# Altium PCB CH32H417QEU-R1.PcbDoc (part 3 of 6)
Units mil, origin at the board's own origin, x right, y up, seen from the top; angles counter-clockwise.
Board outline 4921.26 x 3346.46 mil, 4 copper layers (Top Layer, Layer 1, Layer 2, Bottom Layer), stack 23.756 mil thick; 271 components, 257 nets, 1065 pads, 927 vias.
Unrouted connection lines stored in the file: 149.
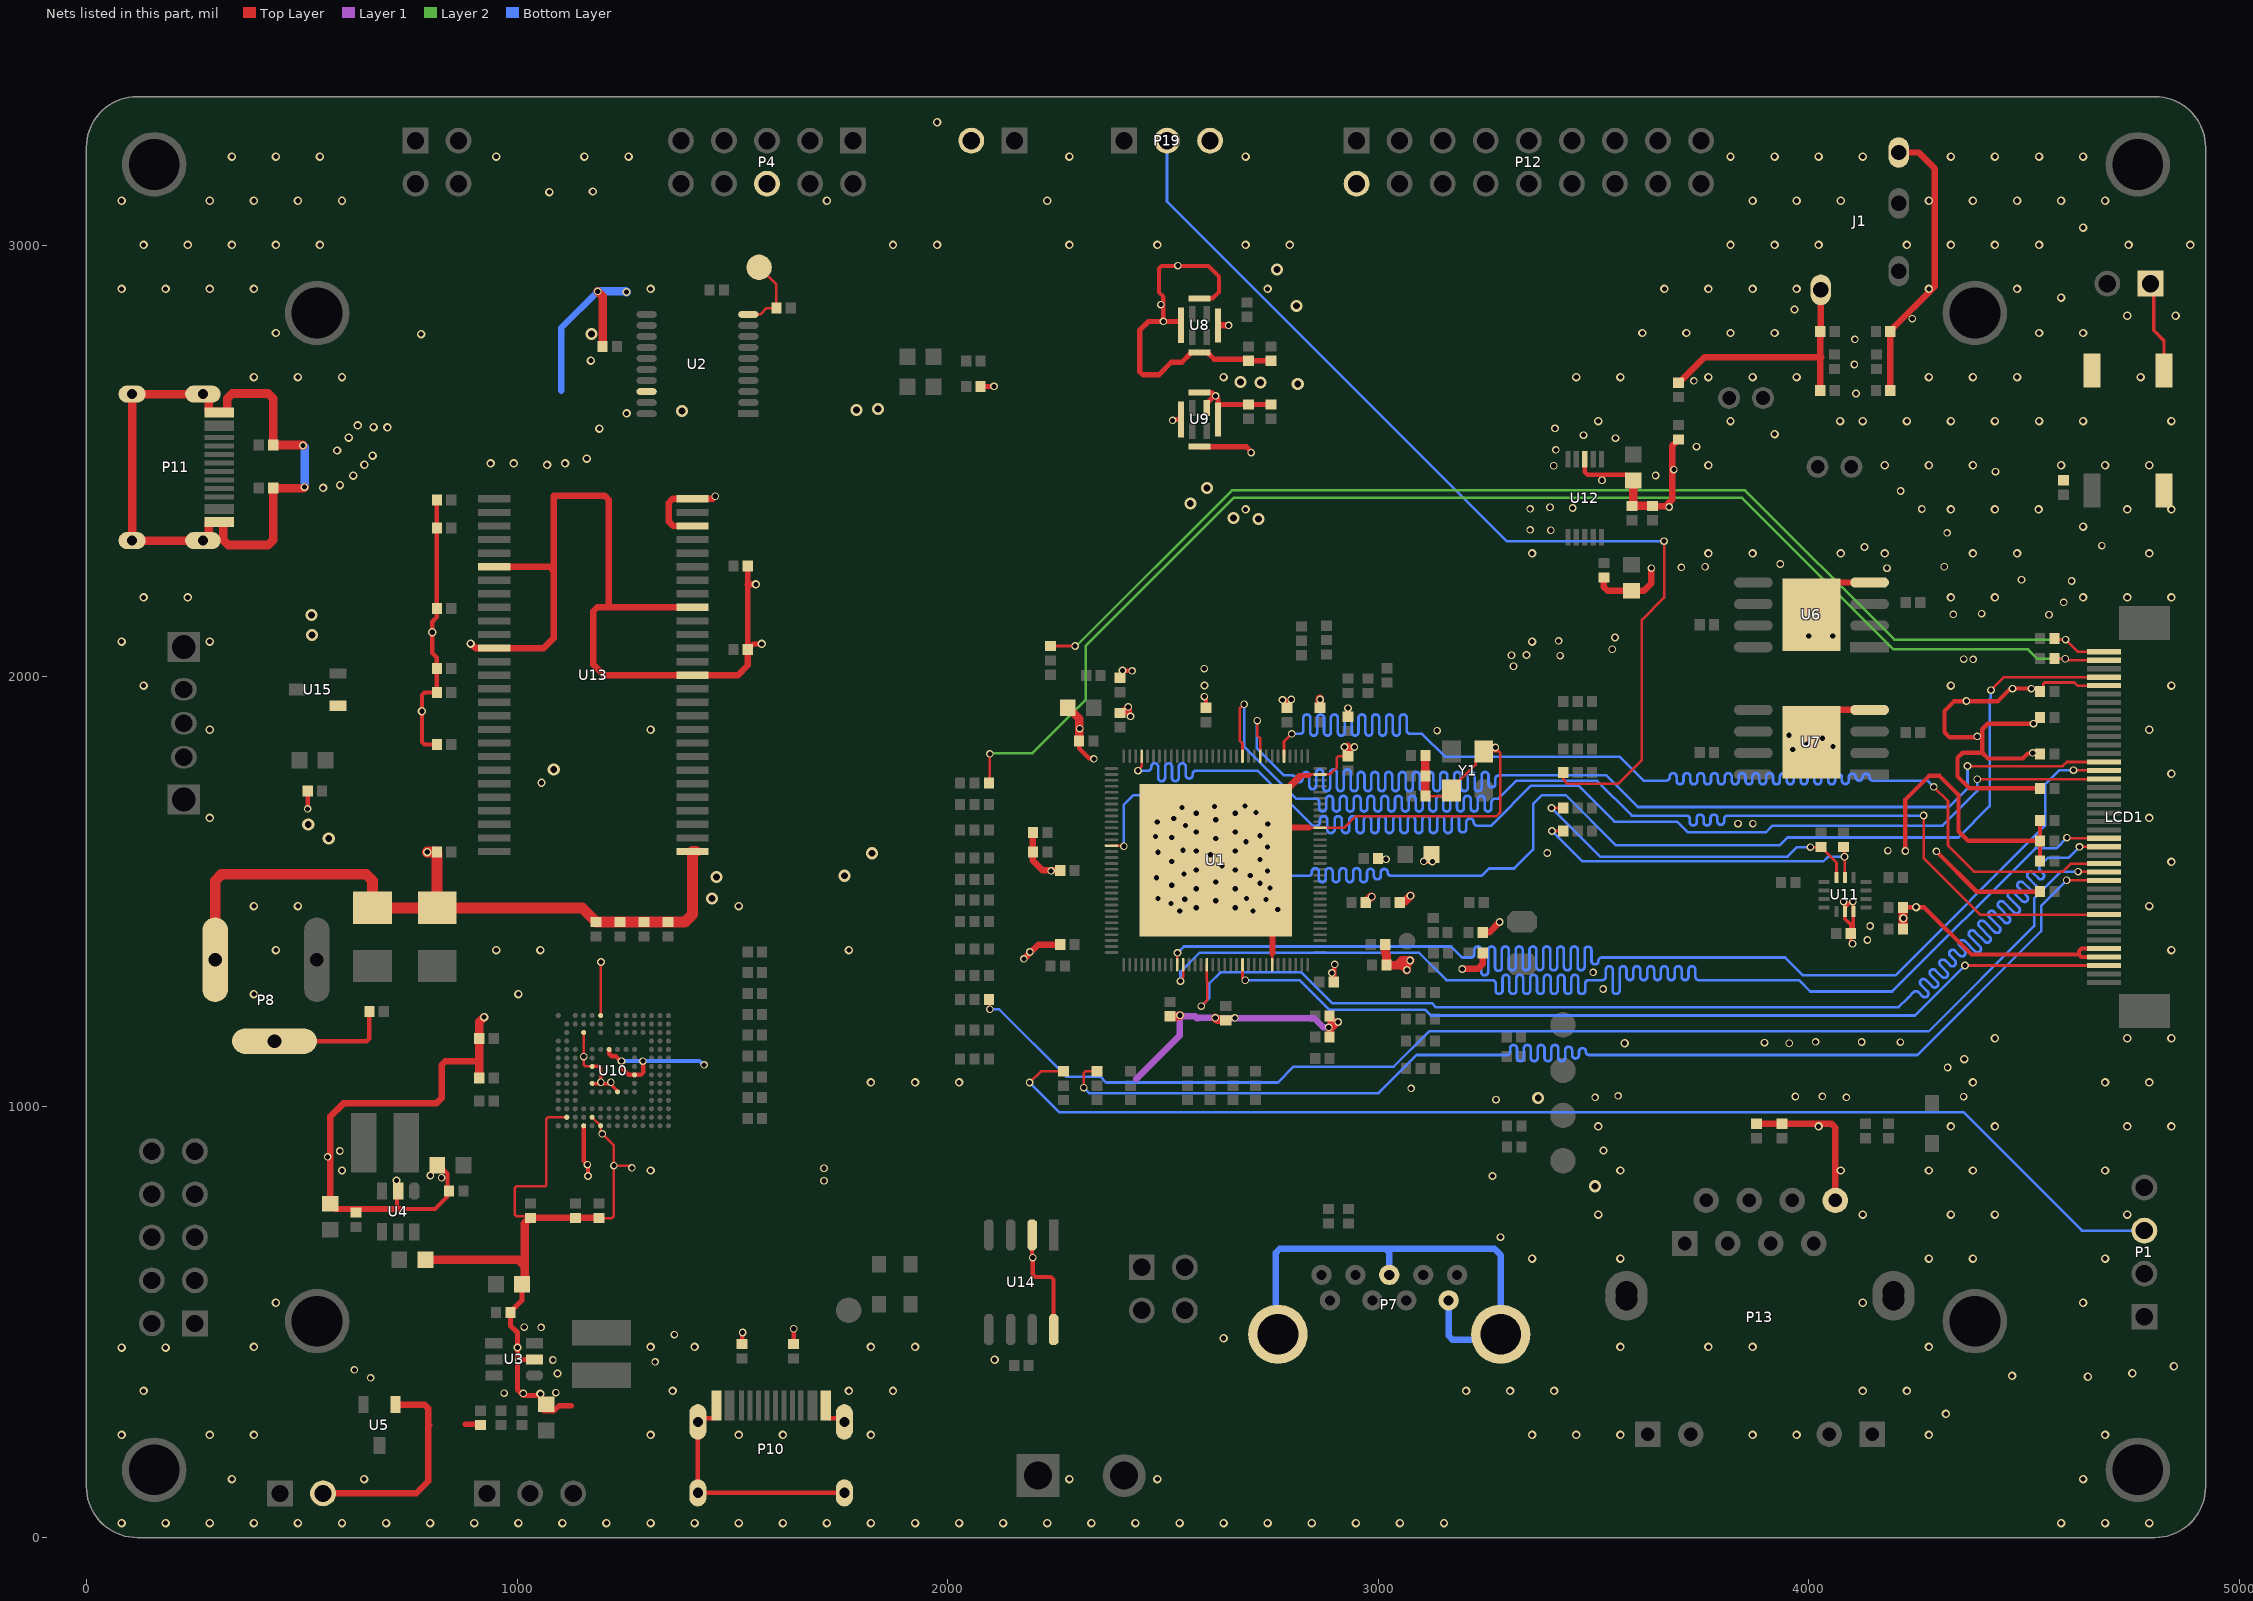
[diagram p5: the nets of this part, all layers, seen from the top]

## Via types
v1: diameter 17.72, hole 11.81, Top Layer to Bottom Layer, tented both sides, 558 vias
v2: diameter 19.68, hole 11.81, Top Layer to Bottom Layer, tented both sides, 320 vias
v3: diameter 28, hole 16, Top Layer to Bottom Layer, tented both sides, 24 vias
v4: diameter 20, hole 12, Top Layer to Bottom Layer, tented both sides, 22 vias
v5: diameter 27.56, hole 15.75, Top Layer to Bottom Layer, tented both sides, 3 vias

## Nets (pads, with @x,y where several pads share a name; then routed paths per layer and width w, separated by ;. In a path a pad name is that pad's centre, name@x,y a point inside that pad or via, vN(x,y) a via of type N, cw(c..) or ccw(c..) an arc to the next point about the centre after c; other vN are vias at no path point) (continued)
GND: C1.2 C2.2 C3.2 C4.2 C5.1 C6.2 C7.2 C8.1 C9.2 C10.2 C11.1 C12.1 C13.1 C14.1 C15.1 C16.1 C17.1 C18.2 C19.1 C20.1 C21.2 C22.1 C23.1 C24.1 C25.2 C26.1 C27.1 C28.2 C29.1 C30.2 C31.1 C32.1 C35.1 C36.1 C37.1 C38.1 C39.1 C40.1 C41.1 C42.1 C43.1 C46.1 C47.1 C48.1 C49.2 C50.2 C51.1 C52.1 C53.2 C54.2 C55.2 C56.1 C57.1 C58.1 C59.1 C60.1 C61.1 C62.1 C63.1 C64.1 C65.1 C67.1 C69.1 C70.1 C71.1 C72.1 C73.1 C74.1 C75.1 C76.1 C81.1 C82.1 J1.1 J1.4 LCD1.4 LCD1.5 LCD1.36 P3.2 P4.6 P7.0 P7.4 P7.7 P8.2 P8.3 P9.2 P10.0 P10.A1 P10.B1 P11.0 P11.A1 P11.B1 P12.2 P13.8 P19.3 R78.1 R84.1 R86.2 R87.2 R88.2 R89.2 R90.2 R91.2 R107.2 R112.2 R113.2 R114.2 R115.2 R116.2 R117.2 R118.2 R119.2 R121.2 R122.2 R124.2 R125.2 R126.1 R127.2 S1.2 S2.2 U1.0 U1.22 U1.31 U1.122 U2.18 U3.2 U4.2 U5.1 U6.0 U6.4 U7.0 U7.4 U8.5 U9.2 U9.5 U10.A6 U10.C4 U10.E7 U10.G5 U10.H10 U10.J5 U10.K8 U10.N2 U10.N5 U10.P4 U10.P6 U11.6 U11.7 U12.8 U13.6 U13.12 U13.28 U13.41 U13.46 U13.52 U13.54 U14.2 U14.8 U15.1 Y1.2 Y1.4 | length 23966.8
  Top Layer w6: C52.1@1025.48,737.09 1025.48,738.07 1025.48,742.19 1020.98,746.69 998.36,746.69 994.84,750.21 994.84,812.12 998.36,815.64 1064.42,815.64 1067.94,819.15 1067.94,972.65 1071.45,976.16 U10.N2@1115.46,976.16 ; v1@1154.83,1118.61 1154.9,1118.67 1154.9,1172.94 U10.C4@1154.83,1173.01 ; v1(1154.97,1116.85) 1154.83,1116.72 1154.83,1098.68 1159.24,1094.27 U10.G5@1174.52,1094.27 ; U10.N5@1174.52,976.16 U10.P6@1194.2,956.48 1194.2,944.49 1197.85,940.84 v1(1197.85,937.67) ; C54.2@1190.78,742.38 1191.19,741.97 1220.35,741.97 1225.05,746.67 v1(1225.05,863.72) ; U10.A6@1194.2,1212.38 1194.62,1212.8 1194.62,1336.42 v1(1195.04,1336.84) ; v1@1199.68,935.84 1225.05,910.47 v1(1225.05,863.72) ; v1(1266.56,858.69) 1263.39,858.69 1258.35,863.72 v1(1225.05,863.72) ; U1.0@2622.69,1572.51 2753.59,1441.6 2753.59,1351.45 ; U1.0@2746.59,1646.34 2748.55,1648.3 2843.61,1648.3 ; U1.0@2748.75,1399.77 2748.98,1399.77 2750.4,1398.35 2750.4,1354.64 2753.59,1351.45 ; U1.122@2753.59,1330.38 2753.59,1351.45 ; U1.0@2758.23,1396.7 2758.23,1356.09 2753.59,1351.45 ; U1.0@2776.86,1726.69 U1.0@2795.97,1745.79 ; U1.0@2785.65,1742.83 2815.13,1772.31 2822.49,1772.31 ; U1.0@2795.33,1643.33 2795.33,1644.1 2796.85,1645.62 2841.34,1645.62 2844.02,1648.3 ; U1.0@2795.97,1738.28 U1.0@2795.97,1745.79 ; U1.0@2797.07,1739.25 2797.48,1739.25 2825.42,1767.19 ; U1.0@2798.86,1652.86 2839.05,1652.86 2843.61,1648.3 ; C28.2@2929.59,1814.56 2907.4,1814.56 2903.88,1811.05 2903.88,1788.83 2890.15,1775.09 2889.65,1775.09 2886.87,1772.31 U1.31@2864.81,1772.31 2844.45,1772.31 ; C17.1@3109.34,1721.83 3156.55,1721.83 Y1.4@3170.02,1735.3 3170.02,1739.24 3226.17,1795.39 3226.17,1807.2 Y1.2@3242.85,1823.88 ; Y1.2@3244.82,1825.85 3279.93,1825.85 3283.45,1822.34 3283.45,1684.57 3274.05,1675.17 2947.35,1675.17 2920.48,1648.3 U1.22@2864.81,1648.3 2844.02,1648.3 ; Y1.2@3245.06,1826.09 Y1.2@3253.83,1834.87 ; v1@3269.71,1836.74 3270.75,1833.87 v1(3271.94,1834.87) ; R114.2@4536.54,1965 4544.47,1972.94 4544.47,1982.64 4547.63,1985.8 4616.48,1985.8 4620.68,1981.6 4623.91,1978.36 LCD1.36@4685,1978.36 ; U1.0@2795.97,1745.79 2817.37,1767.19 ; 2817.37,1767.19 2825.42,1767.19 ; 2817.37,1767.19 2822.49,1772.31 ; 2822.49,1772.31 2844.45,1772.31 ; 2825.42,1767.19 2839.33,1767.19 2844.45,1772.31 ; 2843.61,1648.3 2844.02,1648.3
  Top Layer w8: U10.J5@1174.52,1054.9 1175.08,1054.33 1201.24,1054.33 1201.81,1053.76 1216.42,1053.76 1228.79,1041.39 1228.79,1041.03 1233.57,1036.25 U10.K8@1233.57,1035.22 ; U10.G5@1176.57,1094.29 1190.12,1094.29 1194.81,1089.61 v1(1194.81,1057.38) ; v1(4080.76,1477.34) 4080.76,1474.71 4082.84,1472.63 4082.84,1454.61 U11.6@4083.76,1453.69 ; v1(4101.14,1379.04) 4101.14,1381.67 4097.11,1385.69 C58.1@4097.11,1403.22 ; U11.6@4083.76,1453.69 4083.76,1461.56 4087.93,1465.73 4087.93,1467.11 4098.16,1477.34 4098.16,1474.71 4103.45,1469.41 U11.7@4103.45,1453.69 4102.53,1452.77 4102.53,1408.64 C58.1@4097.11,1403.22 ; U11.6@4083.76,1453.69 4083.76,1437.2 4097.11,1423.85 C58.1@4097.11,1403.22
  Top Layer w10: P8.3@436.82,1152.91 650.82,1152.91 656.68,1158.77 C41.1@656.68,1221.42 ; v1(513.87,1692.22) R87.2@513.87,1734.09 ; U4.2@717.2,804.46 721.3,808.56 U4.2@721.3,816.81 ; v1(719.98,829.29) 721.46,827.81 721.46,807 U4.2@724.01,804.46 ; U4.2@721.3,804.46 721.3,768.95 727.15,763.09 809.42,763.09 838.56,792.23 838.56,845.09 C37.1@819.59,864.05 ; R127.2@813.93,1841.77 785.07,1841.77 779.22,1847.62 779.22,1956.91 785.07,1962.77 R126.1@813.93,1962.77 C75.1@813.93,2017.77 813.93,2043.42 803.18,2054.17 803.18,2127.02 813.93,2137.78 C73.1@813.93,2344.77 C70.1@813.93,2409.77 ; U10.P4@1154.83,956.48 1154.83,874.41 1164.95,864.3 v1(1164.95,839.61) ; U10.E7@1213.89,1133.64 1214.23,1133.29 1214.23,1123.44 1220.09,1117.58 1229.78,1117.58 1240.78,1106.59 v1(1242.61,1106.59) 1242.61,1091.3 1259.32,1074.59 U10.H10@1272.94,1074.59 1287.56,1074.59 1293.42,1080.44 v1@1293.42,1107.01 ; P10.A1@1463.11,306.76 1463.11,284.12 1456.3,277.31 1428.74,277.31 P10.0@1420,268.57 P10.0@1420,104 P10.0@1760.16,104 ; R90.2@1522,449.46 1522.91,450.38 1522.91,475.46 v1(1523.82,476.37) ; R91.2@1642,449.46 1642.36,449.82 1642.36,484.76 v1(1642.72,485.12) ; P10.B1@1717.05,306.76 1717.05,284.12 1723.86,277.31 1751.42,277.31 P10.0@1760.16,268.57 ; v1@2196,650.24 U14.2@2196,703 ; v1(2197.62,650.24) 2197.62,611.28 2203.48,605.43 2240.14,605.43 2246,599.57 U14.8@2246,483 ; C6.2@2305.29,1849.89 2305.29,1832.95 2328.28,1809.97 2337.99,1809.97 v1(2339.47,1808.49) ; C7.2@2400.44,1915.24 C7.2@2401.43,1915.24 ; C8.1@2400.44,1996.65 2404.53,2000.74 2404.53,2012.12 v1(2406.01,2013.59) 2406.37,2013.23 2427.95,2013.23 v1(2428.31,2012.87) ; v1(2501.02,2824.34) 2501.02,2881.8 2491.02,2891.8 2491.02,2947.16 2496.88,2953.02 2605.67,2953.02 2630.04,2928.65 2630.04,2892.7 2615.33,2877.99 U8.5@2585,2877.99 ; v1(2596.18,1952.91) 2599.81,1949.28 C10.2@2599.81,1927.01 ; v1@2784.48,1945.57 2785.95,1944.09 2785.95,1928.98 C12.1@2787.93,1927.01 ; v1@2862.42,1944.06 2863.28,1944.06 2864.18,1943.16 v1@2864.52,1942.82 ; C15.1@2864.18,1927.01 2864.52,1927.35 v1@2864.52,1942.82 ; v1(2864.85,1946.39) 2864.52,1946.05 v1@2864.52,1942.82 ; C13.1@2885.05,1162.87 2886.96,1164.78 2886.96,1177.49 2886.96,1209.78 C14.1@2886.96,1210.76 ; C16.1@2896.43,1289.84 2897.66,1291.07 2897.66,1329.83 v1(2898.88,1331.06) ; C29.1@2929.62,1906.29 C29.1@2929.72,1906.4 ; v1@2929.72,1926.26 v1(2929.82,1926.36) ; U12.8@3479.5,2504.22 3479.5,2474.64 3486.07,2468.06 3578.9,2468.06 C65.1@3592.2,2454.76 ; C59.1@4218.65,1463.58 4267.81,1463.58 4377.41,1353.98 4627.2,1353.98 ; v1(4224.08,1594.56) 4224.08,1714.22 4278.85,1768.99 4303.31,1768.99 4347.45,1724.85 4347.45,1640.51 4369.96,1618 R119.2@4536.54,1618 ; v1(4296.03,1593.64) 4389.67,1500 R117.2@4536.54,1500 ; v1(4516.65,1971.64) 4467.99,1971.64 4438.29,1941.94 4337.18,1941.94 4315.02,1919.79 4315.02,1870.17 4326.88,1858.31 4402.54,1858.31 ; v1(4519.84,1822.37) 4518.36,1820.9 4508.06,1820.9 4496.34,1809.17 4416.09,1809.17 4402.54,1822.72 ; v1(4521.5,1890.09) 4415.43,1890.09 4402.54,1877.2 4402.54,1858.31 ; R116.2@4533.71,1670.28 4536.54,1667.45 R116.2@4536.54,1665 R119.2@4536.54,1618 ; R118.2@4536.54,1571 R119.2@4536.54,1618 ; R115.2@4536.54,1740 4372.63,1740 4345.24,1767.4 4345.24,1810.87 4357.09,1822.72 4402.54,1822.72 ; LCD1.4@4685,1348.44 4632.74,1348.44 4627.2,1353.98 ; LCD1.5@4685,1368.13 4633.06,1368.13 4627.2,1362.27 4627.2,1353.98 ; C7.2@2401.43,1915.24 2417.54,1915.24 2422.66,1910.12 v1@2424.74,1910.12 ; C7.2@2401.43,1915.24 2413.81,1927.62 v1@2417.85,1927.62 ; v1@2417.85,1927.62 2417.85,1919.34 2416.69,1918.18 v1@2423.27,1911.6 ; v1@2417.85,1927.62 v1@2418.59,1928.36 ; v1@2418.59,1928.36 v1@2419.32,1927.62 ; v1@2418.59,1928.36 v1(2419.32,1929.1) v1@2419.32,1927.62 ; v1@2419.32,1927.62 2419.32,1927.01 v1@2420.8,1925.53 ; v1@2419.32,1927.62 2420.8,1926.14 v1@2420.8,1925.53 ; v1@2420.8,1925.53 2420.8,1916.16 v1@2423.27,1913.69 ; v1@2420.8,1925.53 2423.27,1923.06 v1@2423.27,1913.69 ; v1@2423.27,1911.6 v1@2424.74,1910.12 ; v1@2423.27,1911.6 v1@2423.27,1913.69 ; v1@2423.27,1913.69 2424.74,1912.21 v1@2424.74,1910.12 ; 4402.54,1822.72 4402.54,1858.31
  Top Layer w11.81: C32.1@1011.68,588.05 1011.68,551.2 984.52,524.03 C31.1@984.52,523.05 984.52,492.84 1001.13,476.23 v1@1001.13,406.84 ; U3.2@1040.61,413.76 1008.05,413.76 v1@1001.13,406.84 ; 1126.12,306.16 1097.26,306.16 1085.73,294.63 1061.12,294.63 1061.12,323.17 1054.2,330.08 1014.57,330.08 1001.13,343.52 v1@1001.13,406.84
  Top Layer w12: 879,263.11 912.96,263.11 R86.2@914.9,261.16 ; C71.1@1535.86,2062.77 C71.1@1535.86,2063.75 ; C72.1@1535.86,2255.77 1535.86,2213.1 C71.1@1535.86,2063.75 ; v2(1568.24,2075.47) 1548.57,2075.47 1542.66,2069.56 1541.67,2069.56 C71.1@1535.86,2063.75 ; R84.1@2076.52,2673.36 v1(2107.72,2673.36) ; v1(2522.49,2594.49) 2524.04,2594.49 2526.12,2596.57 U9.5@2541.69,2596.57 ; U8.5@2541.69,2815 2541.69,2823.45 2540.8,2824.34 v1(2501.02,2824.34) 2466.6,2824.34 2446.28,2804.02 2446.28,2707.58 2453.31,2700.56 2490.62,2700.56 2519.38,2729.32 2543.61,2729.32 2566.3,2752.01 U8.5@2585,2752.01 2603.7,2752.01 2619.31,2736.4 C82.1@2696.2,2736.4 ; U9.5@2585,2533.58 2585.38,2533.2 2693.64,2533.2 2704.8,2522.05 v1(2704.8,2519.56) ; U9.5@2585,2659.57 2612.77,2659.57 2620.78,2651.56 v1(2622.33,2651.56) ; U9.2@2601.73,2623.15 2601.73,2633.98 2618.22,2650.47 2621.23,2650.47 v1(2622.33,2651.56) ; U9.5@2627.99,2631.73 2627.99,2644.34 2622.33,2650.01 v1(2622.33,2651.56) ; U9.5@2628.31,2596.57 2628.31,2631.73 C46.1@2752.55,2631.73 ; C82.1@2696.2,2732.86 C81.1@2750.74,2732.86 ; C26.1@3123.49,1586.38 3123.49,1585.39 3109.65,1571.56 3106.75,1571.56 v1(3105.66,1570.46) 3105.82,1570.31 3125.34,1570.31 v1(3125.5,1570.15)
  Top Layer w15: P9.2@554.9,105.78 557.97,102.71 765.83,102.71 794.07,130.96 794.07,299.92 785.29,308.71 U5.1@717.94,308.71 ; C38.1@566.61,775.46 566.61,978.04 596.82,1008.25 812.59,1008.25 824.81,1020.47 824.81,1097.26 833.6,1106.05 912.31,1106.05 ; C38.1@578.97,763.09 727.15,763.09 ; 794.7,259.98 795.88,261.16 ; v2(892.27,2075.95) 893.54,2075.95 903.73,2065.76 U13.12@947.4,2065.76 1062.04,2065.76 1084.86,2088.58 1084.86,2245.95 ; U13.6@947.4,2254.73 1076.07,2254.73 1084.86,2245.95 ; C52.1@1020.4,732.01 C52.1@1025.48,737.09 ; C52.1@1025.48,738.07 1029.79,742.38 C52.1@1030.78,742.38 C53.2@1135.78,742.38 C54.2@1190.78,742.38 ; U13.46@1407.4,2160.25 1213.01,2160.25 ; U13.52@1407.4,2349.22 1362.77,2349.22 1352.44,2359.56 1352.44,2403.43 1361.22,2412.21 U13.54@1407.4,2412.21 1454.39,2412.21 v1(1460.37,2418.19) ; C71.1@1535.86,2062.77 1535.86,2025.7 1512.93,2002.77 U13.41@1407.4,2002.77 1201.75,2002.77 1177.07,2027.45 1177.07,2151.12 1186.19,2160.25 1213.01,2160.25 ; 1535.86,2213.1 1536.34,2213.58 v2(1554.69,2213.58) ; v1(2177.02,1343.89) 2210.18,1377.05 C1.2@2261.35,1377.05 ; C4.2@2198.11,1637.93 C3.2@2198.11,1591.87 2198.11,1571.97 2220.79,1549.28 C2.2@2261.35,1549.28 ; U8.5@2628.31,2815 v1(2652.62,2815) ; v1@2886.96,1177.49 v1(2906.76,1197.28) 2906.24,1197.8 2898.94,1197.8 C14.1@2886.96,1209.78 ; C29.1@2929.72,1906.4 v1@2929.72,1926.26 ; v1(3195.02,1320.51) 3231.12,1320.51 3242.84,1332.23 C18.2@3242.84,1358.03 ; C21.2@3242.84,1405.33 3257.44,1405.33 v1(3281.72,1429.6) ; C63.1@3523.86,2229.58 3523.86,2207.55 3532.65,2198.76 C64.1@3588.09,2198.76 3616.92,2198.76 3634.31,2216.15 v1(3634.31,2251.2) ; C62.1@3631.3,2395.11 3666.65,2395.11 3682.19,2410.64 3682.19,2534.78 3692.09,2544.68 3692.09,2545.67 3696.4,2549.98 R121.2@3697.38,2549.98 ; R124.2@3697.38,2681.95 3698.37,2681.95 3757.56,2741.14 4026.46,2741.14 ; C57.1@3878.09,960.99 C56.1@3937.09,960.99 4052.55,960.99 4061.34,952.21 P13.8@4061.34,782.99 ; U6.0@4025.68,2220.25 4027.93,2218 U6.4@4141,2218 ; R125.2@4026.46,2663.42 4026.46,2741.14 ; U7.0@4027.3,1921.71 4027.59,1922 U7.4@4141,1922 ; 4027.52,2787.13 4027.56,2787.17 C69.1@4027.56,2796.96 ; J1.1@4027.56,2897.64 C69.1@4027.56,2796.96 ; 4029.29,2741.14 4026.46,2741.14 ; C69.1@4029.57,2796.96 C69.1@4027.56,2796.96 ; R122.2@4188.95,2663.42 4188.95,2793.19 C67.1@4190.92,2795.16 ; C67.1@4188.95,2801.3 4188.95,2802.28 4292.21,2905.54 4292.21,3179.34 4255.02,3216.54 4209.46,3216.54 J1.4@4204.94,3221.05 ; 1084.86,2245.95 1084.86,2419.07 1204.22,2419.07 1213.01,2410.28 1213.01,2160.25 ; 4026.46,2741.14 4026.46,2796 4027.41,2796.96 C69.1@4027.56,2796.96
  Top Layer w20: P11.0@106.13,2306.09 P11.0@106.13,2655.5 P11.0@270.69,2655.5 275.49,2655.5 284.44,2646.56 284.44,2614.21 327.22,2614.21 327.22,2645.28 338.94,2656.99 422.08,2656.99 433.8,2645.28 R88.2@433.8,2537.19 502.06,2537.19 v1(503.03,2536.22) ; P11.0@106.13,2315.35 P11.0@270.69,2315.35 275.49,2315.35 284.44,2324.29 284.44,2356.65 317.61,2356.65 317.61,2316.77 329.32,2305.06 422.08,2305.06 433.8,2316.77 R89.2@433.8,2437.19 504.2,2437.19 v1(506.61,2439.6) ; C40.1@787.27,645.25 1003.61,645.25 1017.66,631.2 ; R107.2@912.31,1067.38 912.31,1106.05 C51.1@912.31,1159.44 912.31,1197.35 v2(923.61,1208.66) ; C32.1@1017.66,588.05 1017.66,631.2 ; C52.1@1020.4,732.01 1017.66,729.26 1017.66,631.2 ; v1(1187.48,2893.98) 1198.77,2882.69 C30.2@1198.77,2766.1 ; C5.1@2278.83,1928.43 2305.29,1901.98 C6.2@2305.29,1849.89 ; C9.2@2515.86,1210.56 2537.12,1210.56 v1(2539.6,1213.03) ; v1(2621.44,1206.86) 2625.67,1202.63 2644,1202.63 C11.1@2645.81,1200.82 ; C15.1@2864.18,1927.01 2864.18,1943.16 2864.18,1947.79 v1@2864.44,1948.05 ; v1@2929.5,1836.06 2929.5,1814.66 C28.2@2929.59,1814.56 ; C25.2@2971.04,1475.16 2971.04,1476.14 2983.1,1488.2 v1(2984.9,1488.2) ; C23.1@3016.07,1376.84 3016.07,1356.64 3019.07,1353.64 C22.1@3019.07,1329.25 3043.6,1329.25 ; C24.1@3049.76,1475.16 3049.76,1476.14 3051.57,1477.95 3062.11,1477.95 v1(3074.75,1490.59) ; C17.1@3109.34,1721.83 C20.1@3109.34,1768.63 R78.1@3109.34,1816.07 ; C65.1@3592.2,2454.76 3592.2,2398.96 C61.1@3589.22,2395.98 C62.1@3636.76,2395.98 ; C60.1@4218.65,1413.58 4218.65,1437.59 v2(4219.29,1438.23) 4218.65,1438.87 C59.1@4218.65,1463.58 ; 3043.6,1329.25 3055.24,1329.25 v1(3066.48,1318.02) 3066.48,1332.63 v1(3074.14,1340.29) 3054.64,1340.29 3043.6,1329.25
  Top Layer w25: P8.2@299.02,1341.89 299.02,1525.59 313.67,1540.24 649.91,1540.24 664.56,1525.59 C43.1@664.56,1462.4 C42.1@814.56,1462.4 ; v2(791.43,1591.93) 791.52,1591.85 813.85,1591.85 C74.1@813.93,1591.77 813.93,1463.03 C42.1@814.56,1462.4 ; U13.28@1415.59,1593.32 U13.28@1407.4,1593.32 1407.4,1447.23 1389.91,1429.75 C48.1@1350.89,1429.75 C49.2@1295.22,1429.75 C50.2@1239.55,1429.75 C55.2@1183.89,1429.75 1151.23,1462.4 C42.1@814.56,1462.4
  Layer 1 w15: 2437.62,1064.68 2539.35,1166.41 2539.35,1212.79 v1(2539.6,1213.03) ; v1@2539.6,1210.56 2574.69,1210.56 2578.99,1206.25 2582.58,1206.25 2583.19,1206.86 v1(2621.44,1206.86) ; v1@2621.21,1206.25 2851.42,1206.25 2872.21,1185.47 2884.32,1185.47 v1@2884.84,1184.95 ; v1(2885.07,1184.95) 2885.6,1184.95 2899.02,1198.36 v1@2906,1198.36
  Bottom Layer w10: v1(1242.61,1106.59) v1(1292.2,1106.59) 1423.51,1106.59 1433.05,1097.05 v1@1435.06,1097.05
  Bottom Layer w15: 1103.03,2662.97 1102.78,2663.22 1102.78,2809.28 v1(1187.48,2893.98) ; P7.0@2742.08,500 2762.43,520.35 2762.43,661.81 2771.22,670.6 3016.84,670.6 ; P7.0@2759.06,458.36 P7.0@2766.97,466.26 ; P7.7@3025.63,604.06 3025.63,661.81 3016.84,670.6 ; P7.4@3163.42,545 3163.42,468.52 3172.21,459.73 P7.0@3259.7,459.73 ; P7.0@3302.62,476.68 3284.29,495.01 3284.29,656.08 3269.77,670.6 3016.84,670.6
  Bottom Layer w20: v1(503.03,2536.22) 506.61,2532.64 v1(506.61,2439.6) ; v1(1187.48,2893.98) 1252.87,2893.98 v1(1254.26,2892.59)
  other v1: 970.21,335.37 1014.45,335.08 1090.37,336.51 660.2,371.08 1094.1,381.17 622.41,389.5 1320.81,408.03 1004.59,410.3 1083.28,412.61 1001.13,441.53 1365.4,471.46 1055.97,488.35 1016.86,488.66 3284,697.9 1712.8,828.76 824.95,835.61 3265.3,839.83 798.73,841.05 1712.8,857.85 1163.25,865.99 560.16,884.11 588.63,897.67 3523.07,898.84 3273.28,1017.11 3503.56,1022.35 4087.19,1022.25 3968.69,1024.33 4359.29,1023.94 4031.27,1024.79 3556.95,1025.95 3076.27,1043.1 1217.85,1057.38 4322.28,1091.81 1434.38,1097.81 3954.4,1148.04 3896.98,1149.54 4015.71,1151.25 4122.64,1151.02 4212.41,1150.6 2666.87,1206.86 3522.05,1273.91 2892.4,1311.61 3499.13,1312.79 2191.03,1359.82 4135.9,1387.89 4142.21,1420.25 2539,1454.76 2709.45,1455.23 2766.6,1458.42 2519.16,1472.23 4102.16,1477.34 2550.65,1482.45 2739.2,1482.15 2488.94,1484.04 2693.79,1483.87 2749.02,1508.17 2485.27,1532.29 2702.63,1537.24 2548.53,1540.77 2240.35,1548.25 2742.54,1548.38 2636.74,1560.06 3017.87,1575.24 2610.68,1585.74 3392.36,1589.84 2488.09,1591.67 4183.49,1595.27 2546.41,1596.26 2742.54,1603.67 2692.73,1616.05 2483.15,1627.72 2552.03,1654.02 2743.35,1656.93 3835.28,1657.9 3870.02,1657.9 2486.68,1661.64 2525.08,1669.77 2715.72,1684.17 2544.54,1695.45 2619.81,1698.04 2690.71,1698.82 3962.45,1830.22 2921.5,1836.06 2944.46,1836.06 4055.68,1836.8 3995.88,1843.32 4031.37,1856.39 4390.95,1860.82 3954.16,1863.37 3136.84,1873.93 2306.7,1878.78 2424.74,1907.12 4365.72,1942.69 2777.48,1945.57 2797.94,1946.27 4472.93,1971.49 2596.52,1978.95 2595.88,2017.97 3313.95,2023.49 4359.64,2040.06 4381.51,2039.65 3422.22,2048.12 3309.3,2049.05 3344.15,2049.51 3543.44,2063.08 3418.93,2082.5 3549.77,2090.18 3999.76,2094.21 4055.49,2093.72 4557.57,2143.02 4335.23,2143.89 4401.07,2145.69 4591.81,2171.93 4610.08,2221.4 4493.83,2224.42 4181.52,2251.25 3703.83,2253.11 3759.02,2254.62 4314.36,2254.64 3933.56,2260.99 4129.23,2300.41 4680.28,2303.57 4320.9,2333.16 3400.76,2339.27 3352.82,2340.25 3352.74,2389.12 4262.48,2388.75 3451.5,2390.89 3398.92,2392.67 3675.34,2393.19 4212.91,2430.49 3519.56,2455.5 3643.97,2466.57 4433.35,2475.49 3686.42,2480.11 3407.61,2489.02 3412.57,2525.91 3738.9,2533.58 3550.89,2553.21 3476.61,2560.06 3410.44,2575.92 4109.56,2657.01 3732.77,2686.11 4105.49,2724.25 4106.85,2782.47 4239.98,2830.76 3966.5,2851.96 2495.01,2863.14 2534.56,2953.82
  other v2: 81.77,33.62 184.13,33.62 286.5,33.62 388.86,33.62 491.22,33.62 593.58,33.62 695.94,33.62 798.31,33.62 900.67,33.62 1003.03,33.62 1105.39,33.62 1207.76,33.62 1310.12,33.62 1412.48,33.62 1514.84,33.62 1617.2,33.62 1719.57,33.62 1821.93,33.62 1924.29,33.62 2026.65,33.62 2129.02,33.62 2231.38,33.62 2333.74,33.62 2436.1,33.62 2538.46,33.62 2640.83,33.62 2743.19,33.62 2845.55,33.62 2947.91,33.62 3050.27,33.62 3152.64,33.62 4585.71,33.62 4688.07,33.62 4790.43,33.62 337.68,135.98 644.76,135.98 2282.56,135.98 2487.28,135.98 4636.89,135.98 81.77,238.35 286.5,238.35 388.86,238.35 1310.12,238.35 1514.84,238.35 1617.2,238.35 1821.93,238.35 3357.36,238.35 3459.72,238.35 3562.09,238.35 3869.17,238.35 3971.53,238.35 4278.62,238.35 4688.07,238.35 4317.97,287.28 1054.21,333.71 132.95,340.71 1361.3,340.71 1770.75,340.71 1873.11,340.71 3203.82,340.71 3306.18,340.71 3408.54,340.71 4125.08,340.71 4227.44,340.71 4647.84,373.56 4471.84,375.37 4751.31,381.62 4847.51,397.98 2109.02,413.07 81.77,441.07 184.13,441.07 388.86,443.07 1310.12,443.07 1412.48,443.07 1821.93,443.07 1924.29,443.07 3562.09,443.07 3766.81,443.07 3869.17,443.07 4278.62,443.07 2640.83,463.07 440.04,545.43 4125.08,545.43 4636.89,545.43 3357.36,647.79 3562.09,647.79 4278.62,647.79 4380.98,647.79 4688.07,647.79 3510.9,750.16 4125.08,750.16 4329.8,750.16 4432.16,750.16 4739.25,750.16 593.58,852.52 1310.12,852.52 3562.09,852.52 4073.9,852.52 4278.62,852.52 4380.98,852.52 4688.07,852.52 3510.9,954.88 4022.72,954.88 4329.8,954.88 4432.16,954.88 4739.25,954.88 4841.61,954.88 1821.93,1057.24 1924.29,1057.24 2026.65,1057.24 4380.98,1057.24 4688.07,1057.24 4790.43,1057.24 4360.73,1111.06 3572.21,1148 4432.16,1159.61 4739.25,1159.61 4841.61,1159.61 388.86,1261.97 1003.03,1261.97 440.04,1364.33 951.85,1364.33 1054.21,1364.33 1770.75,1364.33 4841.61,1364.33 4248.83,1464.34 388.86,1466.69 491.22,1466.69 1514.84,1466.69 4790.43,1466.69 4841.61,1569.05 286.5,1671.42 4790.43,1671.42 1056.86,1752.94 4841.61,1773.78 286.5,1876.14 1310.12,1876.14 4790.43,1876.14 779.22,1919.04 132.95,1978.5 4329.8,1978.5 4841.61,1978.5 81.77,2080.87 286.5,2080.87 3357.36,2080.87 803.18,2102.38 132.95,2183.23 235.31,2183.23 4329.8,2183.23 4432.16,2183.23 4636.89,2183.23 4739.25,2183.23 4841.61,2183.23 3357.36,2285.59 3766.81,2285.59 3869.17,2285.59 4073.9,2285.59 4176.26,2285.59 4380.98,2285.59 4483.35,2285.59 4790.43,2285.59 4636.89,2347.95 2692.01,2387.95 4329.8,2387.95 4432.16,2387.95 4533.43,2387.95 4739.25,2387.95 4841.61,2387.95 549.85,2437.74 588.9,2444.34 619.78,2466.21 3766.81,2490.31 4176.26,2490.31 4278.62,2490.31 4380.98,2490.31 4585.71,2490.31 4688.07,2490.31 4790.43,2490.31 645.5,2491.47 1070.08,2491.1 938.83,2494.81 992.32,2494.81 1111.63,2494.81 1161.83,2505.51 664.84,2512.44 582.13,2524.53 609.22,2554.38 3920.35,2562.68 1191.39,2575.59 698.78,2578.22 667.12,2578.69 630.05,2582.8 3510.9,2592.68 3817.99,2592.68 4072.72,2592.68 4125.08,2592.68 4227.44,2592.68 4329.8,2592.68 4432.16,2592.68 4534.53,2592.68 4636.89,2592.68 4841.61,2592.68 1254.7,2610.51 388.86,2695.04 491.22,2695.04 593.58,2695.04 2640.83,2695.04 3459.72,2695.04 3562.09,2695.04 3766.81,2695.04 3869.17,2695.04 3971.53,2695.04 4278.62,2695.04 4380.98,2695.04 4483.35,2695.04 4770.43,2695.04 1171.67,2733.13 777.16,2794.8 440.04,2797.4 3613.27,2797.4 3715.63,2797.4 3817.99,2797.4 3920.35,2797.4 4534.53,2797.4 4636.89,2797.4 4739.25,2837.4 4851.61,2837.4 4585.71,2879.76 81.77,2899.76 184.13,2899.76 286.5,2899.76 388.86,2899.76 1310.12,2899.76 2743.19,2899.76 3664.45,2899.76 3766.81,2899.76 3869.17,2899.76 3971.53,2899.76 4278.62,2899.76 4483.35,2899.76 132.95,3002.13 235.31,3002.13 337.68,3002.13 440.04,3002.13 542.4,3002.13 1873.11,3002.13 1975.47,3002.13 2282.56,3002.13 2487.28,3002.13 2692.01,3002.13 2794.37,3002.13 3817.99,3002.13 3920.35,3002.13 4022.72,3002.13 4227.44,3002.13 4329.8,3002.13 4432.16,3002.13 4534.53,3002.13 4742.25,3002.13 4885.61,3002.13 4636.89,3042.13 81.77,3104.49 286.5,3104.49 388.86,3104.49 491.22,3104.49 593.58,3104.49 1719.57,3104.49 2231.38,3104.49 3869.17,3104.49 3971.53,3104.49 4073.9,3104.49 4278.62,3104.49 4380.98,3104.49 4483.35,3104.49 4585.71,3104.49 4688.07,3104.49 1075.39,3124.49 1176.24,3126.01 337.68,3206.85 440.04,3206.85 542.4,3206.85 951.85,3206.85 1156.57,3206.85 1258.94,3206.85 2282.56,3206.85 2692.01,3206.85 3817.99,3206.85 3920.35,3206.85 4022.72,3206.85 4125.08,3206.85 4329.8,3206.85 4432.16,3206.85 4534.53,3206.85 4636.89,3206.85 1975.47,3286.85
  other v3: 3503.23,815.92 3371.41,1020.86 1452.36,1483.83 1463.21,1534.26 1760.15,1537.04 1824.04,1589.24 562.73,1623.2 515.18,1655.73 1085.23,1783.59 523.45,2095.97 522.85,2142.55 2721.65,2365.52 2663.81,2368.08 2563.48,2401.35 2602.38,2437.69 1382.67,2616.04 1788.25,2618.23 1838.37,2620.83 2812.98,2679.12 2726.74,2682.41 2679.83,2683.55 1172.53,2795.47 2810.57,2860.56 2764.97,2945.3
  other v4: 2577.31,1462.84 2668.06,1462.84 2622.69,1478.83 2577.31,1506.71 2668.06,1506.71 2520.33,1515.05 2725.05,1519.54 2622.69,1522.7 2577.31,1550.58 2668.06,1550.58 2520.33,1570.27 2725.05,1574.75 2577.31,1594.45 2668.06,1594.44 2622.69,1623.35 2520.33,1625.49 2725.05,1629.97 2577.31,1638.31 2668.06,1638.31 2622.69,1667.22 2577.31,1682.18 2668.06,1682.18
GPIO_PC12: P1.3 R40.1 | length 2820.5
  Top Layer w6: v1(2190.37,1056.8) 2216.52,1082.95 R40.1@2268.97,1082.95
  Bottom Layer w6: v1(2190.37,1056.8) 2258.92,988.24 4358.93,988.24 4634.17,713 P1.3@4779,713
HSADC: P19.2 R63.1 | length 2378.4
  Top Layer w6: R63.1@3429.7,1776.64 3429.7,1760.24 3439.54,1750.4 3556.95,1750.4 3612.14,1805.59 3612.14,2131.46 3663.67,2182.98 v1(3663.67,2314.11)
  Bottom Layer w6: P19.2@2509.45,3244.09 2509.45,3102.61 3298.49,2313.56 3663.12,2313.56 v1(3663.67,2314.11)
I3C_SCL: R6.1 R22.2 U11.13 | length 811.3
  Top Layer w6: v1(3403.6,1640.86) R6.1@3429.7,1640.86 ; R22.2@4080.25,1603.47 4082.68,1601.04 v1(4082.68,1581.09) 4083.22,1580.55 4083.22,1532.97 U11.13@4083.76,1532.43
  Bottom Layer w6: v1(3403.6,1640.86) 3474.07,1570.38 4033.35,1570.38 4044.06,1581.09 v1(4082.68,1581.09)
I3C_SDA: R8.1 R20.1 U11.14 | length 795.1
  Top Layer w6: v1(3402.32,1694.28) R8.1@3429.7,1694.28 ; v1(4003.29,1603.47) R20.1@4028.22,1603.47 4064.08,1567.6 U11.14@4064.08,1532.43
  Bottom Layer w6: v1(3402.32,1694.28) 3515.22,1581.38 3950.49,1581.38 3972.57,1603.47 v1(4003.29,1603.47)
IAP: IAP1.1 R82.1 U2.10 | length 182.7
  Top Layer w6: U2.10@1537.16,2840.47 1565.25,2840.47 1579.84,2855.06 R82.1@1602.33,2855.06 1602.33,2909.7 IAP1.1@1562.16,2949.87
IIC_SCL: LCD1.39 R9.1 R15.1 | length 3157.5
  Top Layer w6: R9.1@2095.96,1752.71 2098.11,1754.86 v1(2098.11,1819.96) ; R15.1@4570,2042.01 4571.18,2040.83 4598.45,2040.83 4602.29,2036.99 4684.57,2036.99 LCD1.39@4685,2037.42
  Layer 2 w6: v1(2098.11,1819.96) 2099.97,1821.82 2197.04,1821.82 2320.51,1945.29 2320.51,2071.08 2664.14,2414.71 3844.76,2414.71 4196.82,2062.66 4508.93,2062.66 4530.76,2040.83 v1(4595.28,2040.83)
IIC_SDA: LCD1.40 R17.2 R72.1 | length 2778.3
  Top Layer w6: R72.1@2238.71,2070.67 2238.91,2070.47 v1(2295.98,2070.47) ; R17.2@4570,2087.43 4571.98,2085.45 v1(4596.1,2085.45) 4624.47,2057.09 LCD1.40@4685,2057.1
  Layer 2 w6: v1(2295.98,2070.47) 2298.65,2070.47 2660.18,2432 3851.93,2432 4198.47,2085.45 v1(4596.1,2085.45)
KEY: P2.1 S1.1 | length 214.7
  Top Layer w8: P2.1@4793,2912 4800.7,2904.3 4800.7,2803.62 4824.67,2779.65 S1.1@4824.67,2710.37
LCD_B3: LCD1.18 U1.107 | length 3330
  Top Layer w6: v1(2540.79,1292.19) 2540.79,1295.36 2546.9,1301.47 U1.107@2546.9,1330.38 ; v1(4599.16,1625.36) 4600.48,1624.03 LCD1.18@4685,1624.03
  Bottom Layer w6: v1(2540.79,1292.19) 2540.79,1313.88 2585.08,1358.17 3094.89,1358.17 3158.37,1294.69 3230.27,1294.69 3245.55,1294.69 3264.55,1294.69 cw(c3264.55,1286.69) 3272.55,1286.69 3272.55,1270.55 ccw(c3280.55,1270.55) 3288.55,1270.55 3288.55,1298.93 cw(c3296.55,1298.93) 3304.55,1298.93 3304.55,1270.55 ccw(c3312.55,1270.55) 3320.55,1270.55 3320.55,1298.93 cw(c3328.55,1298.93) 3336.55,1298.93 3336.55,1270.55 ccw(c3344.55,1270.55) 3352.55,1270.55 3352.55,1298.93 cw(c3360.55,1298.93) 3368.55,1298.93 3368.55,1270.55 ccw(c3376.55,1270.55) 3384.55,1270.55 3384.55,1298.93 cw(c3392.55,1298.93) 3400.55,1298.93 3400.55,1270.55 ccw(c3408.55,1270.55) 3416.55,1270.55 3416.55,1298.93 cw(c3424.55,1298.93) 3432.55,1298.93 3432.55,1270.55 ccw(c3440.55,1270.55) 3448.55,1270.55 3448.55,1298.93 cw(c3456.55,1298.93) 3464.55,1298.93 3464.55,1270.55 ccw(c3472.55,1270.55) 3480.55,1270.55 3480.55,1286.69 cw(c3488.55,1286.69) 3488.55,1294.69 3517.43,1294.69 3520.43,1294.69 ccw(c3520.43,1302.69) 3528.43,1302.69 3528.43,1318.86 cw(c3536.43,1318.86) 3544.43,1318.86 3544.43,1270.55 ccw(c3552.43,1270.55) 3560.43,1270.55 3560.43,1318.86 cw(c3568.43,1318.86) 3576.43,1318.86 3576.43,1302.69 ccw(c3584.43,1302.69) 3592.43,1302.69 3592.43,1318.86 cw(c3600.43,1318.86) 3608.43,1318.86 3608.43,1302.69 ccw(c3616.43,1302.69) 3624.43,1302.69 3624.43,1318.86 cw(c3632.43,1318.86) 3640.43,1318.86 3640.43,1302.69 ccw(c3648.43,1302.69) 3656.43,1302.69 3656.43,1318.86 cw(c3664.43,1318.86) 3672.43,1318.86 3672.43,1302.69 ccw(c3680.43,1302.69) 3688.43,1302.69 3688.43,1318.86 cw(c3696.43,1318.86) 3704.43,1318.86 3704.43,1302.69 ccw(c3712.43,1302.69) 3720.43,1302.69 3720.43,1318.86 cw(c3728.43,1318.86) 3736.43,1318.86 3736.43,1302.69 ccw(c3744.43,1302.69) 3744.43,1294.69 3775.32,1294.69 3976.7,1294.69 4003.19,1268.2 4193.43,1268.2 4525.94,1600.72 4574.51,1600.72 v1(4599.16,1625.36)
LCD_B4: LCD1.17 U1.111 | length 3330.3
  Top Layer w6: v1(2589.01,1234.21) 2603.32,1248.52 2603.32,1291.61 2602.02,1292.91 U1.111@2602.02,1330.38 ; v1(4628.52,1604.21) 4628.59,1604.28 4684.93,1604.28 LCD1.17@4685,1604.35
  Bottom Layer w6: v1(2589.01,1234.21) 2607.91,1253.11 2607.91,1287.35 2633.11,1312.55 2821.46,1312.55 2892.93,1241.07 3124.38,1241.07 3133.44,1232.01 4208.58,1232.01 4229.72,1253.15 4243.15,1266.59 cw(c4248.81,1260.93) 4254.47,1266.59 4264.05,1257 ccw(c4269.71,1262.66) 4275.37,1257 ccw(c4269.71,1262.66) 4275.37,1268.32 4260.19,1283.49 cw(c4265.85,1289.15) 4260.19,1294.81 cw(c4265.85,1289.15) 4271.51,1294.81 4286.68,1279.63 ccw(c4292.34,1285.29) 4298,1279.63 ccw(c4292.34,1285.29) 4298,1290.94 4282.82,1306.12 cw(c4288.48,1311.78) 4282.82,1317.43 cw(c4288.48,1311.78) 4294.14,1317.43 4309.31,1302.26 ccw(c4314.97,1307.92) 4320.62,1302.26 ccw(c4314.97,1307.92) 4320.62,1313.57 4305.45,1328.75 cw(c4311.11,1334.4) 4305.45,1340.06 cw(c4311.11,1334.4) 4316.76,1340.06 4327.62,1329.2 ccw(c4333.28,1334.86) 4338.94,1329.2 ccw(c4333.28,1334.86) 4338.94,1340.51 4328.08,1351.37 cw(c4333.73,1357.03) 4328.08,1362.69 cw(c4333.73,1357.03) 4339.39,1362.69 4350.03,1352.04 ccw(c4355.69,1357.7) 4361.35,1352.04 ccw(c4355.69,1357.7) 4361.35,1363.36 4350.7,1374 cw(c4356.36,1379.66) 4350.7,1385.31 cw(c4356.36,1379.66) 4362.02,1385.31 4386.01,1361.32 ccw(c4391.66,1366.98) 4397.32,1361.32 ccw(c4391.66,1366.98) 4397.32,1372.64 4373.33,1396.63 cw(c4378.99,1402.29) 4373.33,1407.94 cw(c4378.99,1402.29) 4384.65,1407.94 4408.63,1383.95 ccw(c4414.29,1389.61) 4419.95,1383.95 ccw(c4414.29,1389.61) 4419.95,1395.27 4395.96,1419.26 cw(c4401.62,1424.91) 4395.96,1430.57 cw(c4401.62,1424.91) 4407.27,1430.57 4431.26,1406.58 ccw(c4436.92,1412.24) 4442.58,1406.58 ccw(c4436.92,1412.24) 4442.58,1417.89 4418.59,1441.88 cw(c4424.24,1447.54) 4418.59,1453.2 cw(c4424.24,1447.54) 4429.9,1453.2 4453.89,1429.21 ccw(c4459.55,1434.86) 4465.2,1429.21 ccw(c4459.55,1434.86) 4465.2,1440.52 4441.21,1464.51 cw(c4446.87,1470.17) 4441.21,1475.82 cw(c4446.87,1470.17) 4452.53,1475.82 4476.52,1451.83 ccw(c4482.17,1457.49) 4487.83,1451.83 ccw(c4482.17,1457.49) 4487.83,1463.15 4463.84,1487.14 cw(c4469.5,1492.8) 4463.84,1498.45 cw(c4469.5,1492.8) 4475.15,1498.45 4495.15,1478.45 ccw(c4500.81,1484.11) 4506.47,1478.45 ccw(c4500.81,1484.11) 4506.47,1489.77 4486.47,1509.77 cw(c4492.13,1515.42) 4486.47,1521.08 cw(c4492.13,1515.42) 4497.78,1521.08 4515.26,1503.6 ccw(c4520.92,1509.26) 4526.57,1503.6 ccw(c4520.92,1509.26) 4526.57,1514.92 4509.1,1532.39 cw(c4514.75,1538.05) 4509.1,1543.71 cw(c4514.75,1538.05) 4520.41,1543.71 4532.82,1531.3 ccw(c4538.48,1536.95) 4544.13,1531.3 ccw(c4538.48,1536.95) 4544.13,1542.61 4537.31,1549.43 cw(c4542.97,1555.09) 4537.31,1560.75 4554.72,1578.15 4555.28,1578.72 4603.02,1578.72 v1(4628.52,1604.21)
LCD_B5: LCD1.15 U1.37 | length 3330.3
  Top Layer w6: U1.37@2781.15,1814.64 2781.15,1849.01 2798.69,1866.55 v1(2799.01,1866.55) ; v1(4289.92,1743.43) 4322.97,1710.37 4322.97,1607.19 4383.47,1546.69 4589.97,1546.69 4608.25,1564.98 LCD1.15@4685,1564.98
  Bottom Layer w6: v1(2799.01,1866.55) 2815.08,1866.55 2818.08,1866.55 ccw(c2818.08,1874.55) 2826.08,1874.55 2826.08,1903.55 cw(c2834.08,1903.55) 2842.08,1903.55 2842.08,1870.41 ccw(c2850.08,1870.41) 2858.08,1870.41 2858.08,1903.55 cw(c2866.08,1903.55) 2874.08,1903.55 2874.08,1870.41 ccw(c2882.08,1870.41) 2890.08,1870.41 2890.08,1903.55 cw(c2898.08,1903.55) 2906.08,1903.55 2906.08,1870.41 ccw(c2914.08,1870.41) 2922.08,1870.41 2922.08,1900.5 cw(c2930.08,1900.5) 2938.08,1900.5 2938.08,1870.41 ccw(c2946.08,1870.41) 2954.08,1870.41 2954.08,1903.55 cw(c2962.08,1903.55) 2970.08,1903.55 2970.08,1870.41 ccw(c2978.08,1870.41) 2986.08,1870.41 2986.08,1903.55 cw(c2994.08,1903.55) 3002.08,1903.55 3002.08,1870.41 ccw(c3010.08,1870.41) 3018.08,1870.41 3018.08,1903.55 cw(c3026.08,1903.55) 3034.08,1903.55 3034.08,1870.41 ccw(c3042.08,1870.41) 3050.08,1870.41 3050.08,1903.55 cw(c3058.08,1903.55) 3066.08,1903.55 3066.08,1874.55 ccw(c3074.08,1874.55) 3074.08,1866.55 3101.94,1866.55 3155,1813.49 3560.58,1813.49 3616.08,1757.99 3665.76,1757.99 3668.76,1757.99 ccw(c3668.76,1765.99) 3676.76,1765.99 3676.76,1767.18 cw(c3684.76,1767.18) 3692.76,1767.18 3692.76,1757.46 ccw(c3700.76,1757.46) 3708.76,1757.46 3708.76,1767.18 cw(c3716.76,1767.18) 3724.76,1767.18 3724.76,1757.46 ccw(c3732.76,1757.46) 3740.76,1757.46 3740.76,1767.18 cw(c3748.76,1767.18) 3756.76,1767.18 3756.76,1757.46 ccw(c3764.76,1757.46) 3772.76,1757.46 3772.76,1767.18 cw(c3780.76,1767.18) 3788.76,1767.18 3788.76,1757.46 ccw(c3796.76,1757.46) 3804.76,1757.46 3804.76,1767.18 cw(c3812.76,1767.18) 3820.76,1767.18 3820.76,1757.46 ccw(c3828.76,1757.46) 3836.76,1757.46 3836.76,1767.18 cw(c3844.76,1767.18) 3852.76,1767.18 3852.76,1757.46 ccw(c3860.76,1757.46) 3868.76,1757.46 3868.76,1767.18 cw(c3876.76,1767.18) 3884.76,1767.18 3884.76,1757.46 ccw(c3892.76,1757.46) 3900.76,1757.46 3900.76,1767.18 cw(c3908.76,1767.18) 3916.76,1767.18 3916.76,1757.46 ccw(c3924.76,1757.46) 3932.76,1757.46 3932.76,1767.18 cw(c3940.76,1767.18) 3948.76,1767.18 3948.76,1757.46 ccw(c3956.76,1757.46) 3964.76,1757.46 3964.76,1767.18 cw(c3972.76,1767.18) 3980.76,1767.18 3980.76,1757.46 ccw(c3988.76,1757.46) 3996.76,1757.46 3996.76,1767.18 cw(c4004.76,1767.18) 4012.76,1767.18 4012.76,1757.46 ccw(c4020.76,1757.46) 4028.76,1757.46 4028.76,1767.18 cw(c4036.76,1767.18) 4044.76,1767.18 4044.76,1757.46 ccw(c4052.76,1757.46) 4060.76,1757.46 4060.76,1765.44 cw(c4068.76,1765.44) 4076.76,1765.44 4076.76,1757.99 ccw(c4084.76,1757.99) 4092.76,1757.99 4092.76,1765.99 cw(c4100.76,1765.99) 4108.76,1765.99 ccw(c4116.76,1765.99) 4124.76,1765.99 cw(c4132.76,1765.99) 4140.76,1765.99 ccw(c4148.76,1765.99) 4148.76,1757.99 4170.81,1757.99 4275.36,1757.99 v1(4289.92,1743.43)
LCD_B6: LCD1.14 R28.1 | length 2921.9
  Top Layer w6: R28.1@2095.96,1249.4 2097.99,1247.37 v1(2097.99,1226.98) ; v1(4625.28,1546.69) 4625.98,1545.99 4684.3,1545.99 LCD1.14@4685,1545.29
  Bottom Layer w6: v1(2097.99,1226.98) 2119.37,1226.98 2276.02,1070.33 2354.63,1070.33 2368.09,1056.87 2766.95,1056.87 2803.64,1093.56 3035.99,1093.56 3117.93,1175.49 4278.36,1175.49 4523.12,1420.25 4523.12,1484.6 4585.22,1546.69 v1(4625.28,1546.69)
LCD_B7: LCD1.13 R42.1 | length 2987.7
  Top Layer w6: v1(2316.06,1044.88) 2316.06,1079.43 2319.57,1082.95 R42.1@2346.96,1082.95 ; v1(4598.43,1526.46) 4598.62,1526.65 4683.95,1526.65 LCD1.13@4685,1525.61
  Bottom Layer w6: v1(2316.06,1044.88) 2328.63,1032.3 2333.09,1032.3 2333.16,1032.24 3000.54,1032.24 3088.97,1120.67 3295.12,1120.67 3298.12,1120.67 ccw(c3298.12,1128.67) 3306.12,1128.67 3306.12,1136.09 cw(c3314.12,1136.09) 3322.12,1136.09 3322.12,1114.28 ccw(c3330.12,1114.28) 3338.12,1114.28 3338.12,1136.09 cw(c3346.12,1136.09) 3354.12,1136.09 3354.12,1114.28 ccw(c3362.12,1114.28) 3370.12,1114.28 3370.12,1136.09 cw(c3378.12,1136.09) 3386.12,1136.09 3386.12,1114.28 ccw(c3394.12,1114.28) 3402.12,1114.28 3402.12,1136.09 cw(c3410.12,1136.09) 3418.12,1136.09 3418.12,1114.28 ccw(c3426.12,1114.28) 3434.12,1114.28 3434.12,1132.05 cw(c3442.12,1132.05) 3450.12,1132.05 3450.12,1120.67 ccw(c3458.12,1120.67) 3466.12,1120.67 3466.12,1128.67 cw(c3474.12,1128.67) 3482.12,1128.67 ccw(c3490.12,1128.67) 3490.12,1120.67 3742.12,1120.67 4251.71,1120.67 4539.12,1408.09 4539.12,1467.16 v1(4598.43,1526.46)
LCD_BL: LCD1.3 U1.117 | length 2115.7
  Top Layer w6: U1.117@2684.7,1330.38 2684.7,1299.45 2689.8,1294.34 v1(2691.18,1294.34) ; v1(4362.45,1328.53) 4362.56,1328.64 4684.89,1328.64 LCD1.3@4685,1328.76
  Bottom Layer w6: v1(2691.18,1294.34) 2691.53,1294.69 2817.45,1294.69 2885.86,1226.28 3108.2,1226.28 3122,1212.48 4246.4,1212.48 v1(4362.45,1328.53)
LCD_DCLK: LCD1.37 U1.78 | length 3330.3
  Top Layer w6: U1.78@2380.56,1606.96 2380.62,1606.9 2407.77,1606.9 v1(2409.12,1605.55) ; v1(4422.78,1968.14) 4452.69,1998.05 LCD1.37@4685,1998.05
  Bottom Layer w6: v1(2409.12,1605.55) 2409.12,1701.92 2431.62,1724.42 2730.45,1724.42 2770.73,1684.14 2770.73,1553.33 2787.38,1536.68 2834.85,1536.68 2837.85,1536.68 ccw(c2837.85,1544.68) 2845.85,1544.68 2845.85,1546.68 cw(c2853.85,1546.68) 2861.85,1546.68 2861.85,1530.11 ccw(c2869.85,1530.11) 2877.85,1530.11 2877.85,1546.68 cw(c2885.85,1546.68) 2893.85,1546.68 2893.85,1530.11 ccw(c2901.85,1530.11) 2909.85,1530.11 2909.85,1546.68 cw(c2917.85,1546.68) 2925.85,1546.68 2925.85,1530.11 ccw(c2933.85,1530.11) 2941.85,1530.11 2941.85,1546.68 cw(c2949.85,1546.68) 2957.85,1546.68 2957.85,1530.11 ccw(c2965.85,1530.11) 2973.85,1530.11 2973.85,1545.11 cw(c2981.85,1545.11) 2989.85,1545.11 2989.85,1536.68 ccw(c2997.85,1536.68) 3005.85,1536.68 3005.85,1544.68 cw(c3013.85,1544.68) 3021.85,1544.68 ccw(c3029.85,1544.68) 3029.85,1536.68 3181.71,1536.68 3239.96,1536.68 3257.14,1553.85 3315.38,1553.85 3359.44,1597.91 3359.44,1703.9 3379.96,1724.42 3435.39,1724.42 3552.33,1607.48 3932.16,1607.48 3950.5,1625.82 4347.01,1625.82 4419.72,1698.54 4419.72,1947.28 4422.78,1950.34 v1(4422.78,1968.14)
LCD_DE: LCD1.9 U1.44 | length 3330.3
  Top Layer w6: U1.44@2684.7,1814.64 2684.7,1844.33 2678.25,1850.78 2678.25,1924.88 v1(2688.55,1935.19) ; v1(4266.51,1676.8) 4266.51,1577.96 4397.6,1446.87 LCD1.9@4685,1446.87
  Bottom Layer w6: v1(2688.55,1935.19) 2688.55,1836.82 2809.6,1715.78 2838.95,1715.78 2854.85,1715.78 cw(c2854.85,1707.78) 2862.85,1707.78 2862.85,1694.25 ccw(c2870.85,1694.25) 2878.85,1694.25 2878.85,1714.54 cw(c2886.85,1714.54) 2894.85,1714.54 2894.85,1694.25 ccw(c2902.85,1694.25) 2910.85,1694.25 2910.85,1714.54 cw(c2918.85,1714.54) 2926.85,1714.54 2926.85,1694.25 ccw(c2934.85,1694.25) 2942.85,1694.25 2942.85,1714.54 cw(c2950.85,1714.54) 2958.85,1714.54 2958.85,1694.25 ccw(c2966.85,1694.25) 2974.85,1694.25 2974.85,1714.54 cw(c2982.85,1714.54) 2990.85,1714.54 2990.85,1694.25 ccw(c2998.85,1694.25) 3006.85,1694.25 3006.85,1714.54 cw(c3014.85,1714.54) 3022.85,1714.54 3022.85,1694.25 ccw(c3030.85,1694.25) 3038.85,1694.25 3038.85,1714.54 cw(c3046.85,1714.54) 3054.85,1714.54 3054.85,1694.25 ccw(c3062.85,1694.25) 3070.85,1694.25 3070.85,1714.54 cw(c3078.85,1714.54) 3086.85,1714.54 3086.85,1694.25 ccw(c3094.85,1694.25) 3102.85,1694.25 3102.85,1714.54 cw(c3110.85,1714.54) 3118.85,1714.54 3118.85,1694.25 ccw(c3126.85,1694.25) 3134.85,1694.25 3134.85,1714.54 cw(c3142.85,1714.54) 3150.85,1714.54 3150.85,1694.25 ccw(c3158.85,1694.25) 3166.85,1694.25 3166.85,1714.54 cw(c3174.85,1714.54) 3182.85,1714.54 3182.85,1694.25 ccw(c3190.85,1694.25) 3198.85,1694.25 3198.85,1714.54 cw(c3206.85,1714.54) 3214.85,1714.54 3214.85,1694.25 ccw(c3222.85,1694.25) 3230.85,1694.25 3230.85,1714.54 cw(c3238.85,1714.54) 3246.85,1714.54 3246.85,1694.25 ccw(c3254.85,1694.25) 3262.85,1694.25 3262.85,1707.78 cw(c3270.85,1707.78) 3270.85,1715.78 3273.85,1715.78 3278.55,1715.78 3320.2,1757.42 3508.4,1757.42 3589.02,1676.8 3696.48,1676.8 3715.48,1676.8 cw(c3715.48,1668.8) 3723.48,1668.8 3723.48,1661.7 ccw(c3731.48,1661.7) 3739.48,1661.7 3739.48,1670.99 cw(c3747.48,1670.99) 3755.48,1670.99 3755.48,1661.7 ccw(c3763.48,1661.7) 3771.48,1661.7 3771.48,1670.99 cw(c3779.48,1670.99) 3787.48,1670.99 3787.48,1663.41 ccw(c3795.48,1663.41) 3803.48,1663.41 3803.48,1668.8 cw(c3811.48,1668.8) 3811.48,1676.8 3861.9,1676.8 v1(4266.51,1676.8)
LCD_G2: LCD1.27 U1.41 | length 3328.3
  Top Layer w6: v1(2718.98,1897.36) 2718.98,1862.34 2726.04,1855.29 U1.41@2726.04,1814.64 ; v1(4368.29,1791.72) 4589.44,1791.72 4598.91,1801.2 LCD1.27@4685,1801.2
  Bottom Layer w6: v1(2718.98,1897.36) 2718.1,1896.48 2718.1,1832.79 2776.62,1774.27 2780.96,1769.93 2800.03,1769.93 cw(c2800.03,1761.93) 2808.03,1761.93 ccw(c2816.03,1761.93) 2824.03,1761.93 2824.03,1769.93 cw(c2832.03,1769.93) 2840.03,1769.93 2840.03,1745.81 ccw(c2848.03,1745.81) 2856.03,1745.81 2856.03,1775.88 cw(c2864.03,1775.88) 2872.03,1775.88 2872.03,1741.54 ccw(c2880.03,1741.54) 2888.03,1741.54 2888.03,1775.88 cw(c2896.03,1775.88) 2904.03,1775.88 2904.03,1741.54 ccw(c2912.03,1741.54) 2920.03,1741.54 2920.03,1775.88 cw(c2928.03,1775.88) 2936.03,1775.88 2936.03,1741.54 ccw(c2944.03,1741.54) 2952.03,1741.54 2952.03,1770.09 cw(c2960.03,1770.09) 2968.03,1770.09 2968.03,1741.54 ccw(c2976.03,1741.54) 2984.03,1741.54 2984.03,1770.04 cw(c2992.03,1770.04) 3000.03,1770.04 3000.03,1741.54 ccw(c3008.03,1741.54) 3016.03,1741.54 3016.03,1770.04 cw(c3024.03,1770.04) 3032.03,1770.04 3032.03,1741.54 ccw(c3040.03,1741.54) 3048.03,1741.54 3048.03,1770.04 cw(c3056.03,1770.04) 3064.03,1770.04 3064.03,1741.54 ccw(c3072.03,1741.54) 3080.03,1741.54 3080.03,1770.04 cw(c3088.03,1770.04) 3096.03,1770.04 3096.03,1741.54 ccw(c3104.03,1741.54) 3112.03,1741.54 3112.03,1770.04 cw(c3120.03,1770.04) 3128.03,1770.04 3128.03,1741.54 ccw(c3136.03,1741.54) 3144.03,1741.54 3144.03,1770.04 cw(c3152.03,1770.04) 3160.03,1770.04 3160.03,1741.54 ccw(c3168.03,1741.54) 3176.03,1741.54 3176.03,1770.04 cw(c3184.03,1770.04) 3192.03,1770.04 3192.03,1741.54 ccw(c3200.03,1741.54) 3208.03,1741.54 3208.03,1770.04 cw(c3216.03,1770.04) 3224.03,1770.04 3224.03,1741.54 ccw(c3232.03,1741.54) 3240.03,1741.54 3240.03,1770.04 cw(c3248.03,1770.04) 3256.03,1770.04 3256.03,1750.38 ccw(c3264.03,1750.38) 3272.03,1750.38 3272.03,1761.93 cw(c3280.03,1761.93) 3280.03,1769.93 3283.03,1769.93 3529.76,1769.93 3603.03,1696.67 4325.31,1696.67 4368.29,1739.65 v1(4368.29,1791.72)
LCD_G3: LCD1.26 U1.106 | length 3330.5
  Top Layer w6: U1.106@2533.12,1330.38 2533.18,1330.44 2533.18,1357.57 v1(2533.67,1358.07) ; v1(4614.39,1782.39) 4614.83,1781.95 4684.56,1781.95 LCD1.26@4685,1781.51
  Bottom Layer w6: v1(2533.67,1358.07) 2548.34,1372.74 3169.13,1372.74 3194.8,1347.07 3212.16,1347.07 3215.16,1347.07 ccw(c3215.16,1355.07) 3223.16,1355.07 3223.16,1364.74 cw(c3231.16,1364.74) 3239.16,1364.74 3239.16,1313.69 ccw(c3247.16,1313.69) 3255.16,1313.69 3255.16,1364.74 cw(c3263.16,1364.74) 3271.16,1364.74 3271.16,1323.98 ccw(c3279.16,1323.98) 3287.16,1323.98 3287.16,1364.74 cw(c3295.16,1364.74) 3303.16,1364.74 3303.16,1325.42 ccw(c3311.16,1325.42) 3319.16,1325.42 3319.16,1364.74 cw(c3327.16,1364.74) 3335.16,1364.74 3335.16,1325.42 ccw(c3343.16,1325.42) 3351.16,1325.42 3351.16,1364.74 cw(c3359.16,1364.74) 3367.16,1364.74 3367.16,1325.42 ccw(c3375.16,1325.42) 3383.16,1325.42 3383.16,1364.74 cw(c3391.16,1364.74) 3399.16,1364.74 3399.16,1325.42 ccw(c3407.16,1325.42) 3415.16,1325.42 3415.16,1364.74 cw(c3423.16,1364.74) 3431.16,1364.74 3431.16,1325.42 ccw(c3439.16,1325.42) 3447.16,1325.42 3447.16,1364.74 cw(c3455.16,1364.74) 3463.16,1364.74 3463.16,1325.42 ccw(c3471.16,1325.42) 3479.16,1325.42 3479.16,1364.45 cw(c3487.16,1364.45) 3495.16,1364.45 3495.16,1339.07 ccw(c3503.16,1339.07) 3511.16,1339.07 cw(c3519.16,1339.07) 3519.16,1347.07 3579.35,1347.07 3944.95,1347.07 3986.24,1305.77 4201.17,1305.77 4548.74,1653.33 4548.74,1748.81 4582.31,1782.39 v1(4614.39,1782.39)
LCD_G4: LCD1.25 U1.61 | length 3330.3
  Top Layer w6: v1(2442.16,1781.02) 2442.16,1782.93 2450.44,1791.21 U1.61@2450.44,1814.64 ; v1(4390.88,1761.19) 4391.2,1761.51 4684.68,1761.51 LCD1.25@4685,1761.83
  Bottom Layer w6: v1@2442.16,1780.92 2461.92,1780.92 2464.92,1780.92 ccw(c2464.92,1788.92) 2472.92,1788.92 2472.92,1790.19 cw(c2480.92,1790.19) 2488.92,1790.19 2488.92,1764.58 ccw(c2496.92,1764.58) 2504.92,1764.58 2504.92,1790.19 cw(c2512.92,1790.19) 2520.92,1790.19 2520.92,1764.58 ccw(c2528.92,1764.58) 2536.92,1764.58 2536.92,1790.19 cw(c2544.92,1790.19) 2552.92,1790.19 2552.92,1770.8 ccw(c2560.92,1770.8) 2568.92,1770.8 2568.92,1772.92 cw(c2576.92,1772.92) 2576.92,1780.92 2701.63,1780.92 2720,1780.92 2848.04,1652.88 2853.02,1652.88 2856.02,1652.88 ccw(c2856.02,1661.38) 2864.52,1661.38 2864.52,1666.75 cw(c2873.02,1666.75) 2881.52,1666.75 2881.52,1644.53 ccw(c2890.02,1644.53) 2898.52,1644.53 2898.52,1666.75 cw(c2907.02,1666.75) 2915.52,1666.75 2915.52,1644.53 ccw(c2924.02,1644.53) 2932.52,1644.53 2932.52,1666.75 cw(c2941.02,1666.75) 2949.52,1666.75 2949.52,1644.53 ccw(c2958.02,1644.53) 2966.52,1644.53 2966.52,1666.75 cw(c2975.02,1666.75) 2983.52,1666.75 2983.52,1644.53 ccw(c2992.02,1644.53) 3000.52,1644.53 3000.52,1666.75 cw(c3009.02,1666.75) 3017.52,1666.75 3017.52,1644.53 ccw(c3026.02,1644.53) 3034.52,1644.53 3034.52,1667.03 cw(c3043.02,1667.03) 3051.52,1667.03 3051.52,1644.53 ccw(c3060.02,1644.53) 3068.52,1644.53 3068.52,1667.03 cw(c3077.02,1667.03) 3085.52,1667.03 3085.52,1644.53 ccw(c3094.02,1644.53) 3102.52,1644.53 3102.52,1667.03 cw(c3111.02,1667.03) 3119.52,1667.03 3119.52,1644.53 ccw(c3128.02,1644.53) 3136.52,1644.53 3136.52,1667.03 cw(c3145.02,1667.03) 3153.52,1667.03 3153.52,1644.53 ccw(c3162.02,1644.53) 3170.52,1644.53 3170.52,1667.03 cw(c3179.02,1667.03) 3187.52,1667.03 3187.52,1646.14 ccw(c3196.02,1646.14) 3204.52,1646.14 3204.52,1661.38 cw(c3213.02,1661.38) 3221.52,1661.38 ccw(c3230.02,1661.38) 3230.02,1652.88 3261.32,1652.88 3267.08,1658.64 3354.86,1746.42 3464.54,1746.42 3548.37,1662.59 3694.05,1662.59 3718.25,1638.39 3901.02,1638.39 3916.05,1653.43 4310.65,1653.43 4390.88,1733.66 v1(4390.88,1761.19)